# Altium PCB Input_Borad.PcbDoc
Units mil, origin at the board's own origin, x right, y up, seen from the top; angles counter-clockwise.
Board outline 885.83 x 794.57 mil, 2 copper layers (Top Layer, Bottom Layer); 3 components, 2 nets, 12 pads, 0 vias.
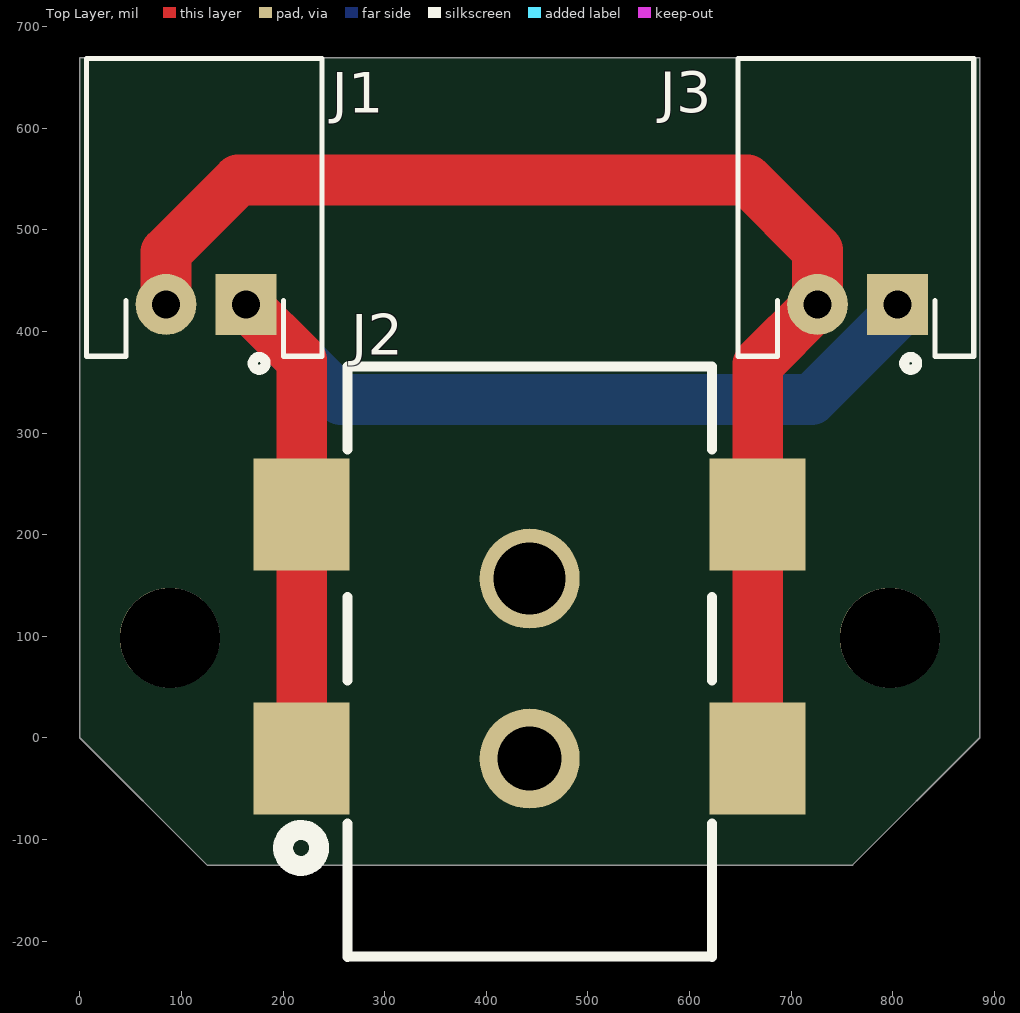
[diagram p0: Top Layer view]
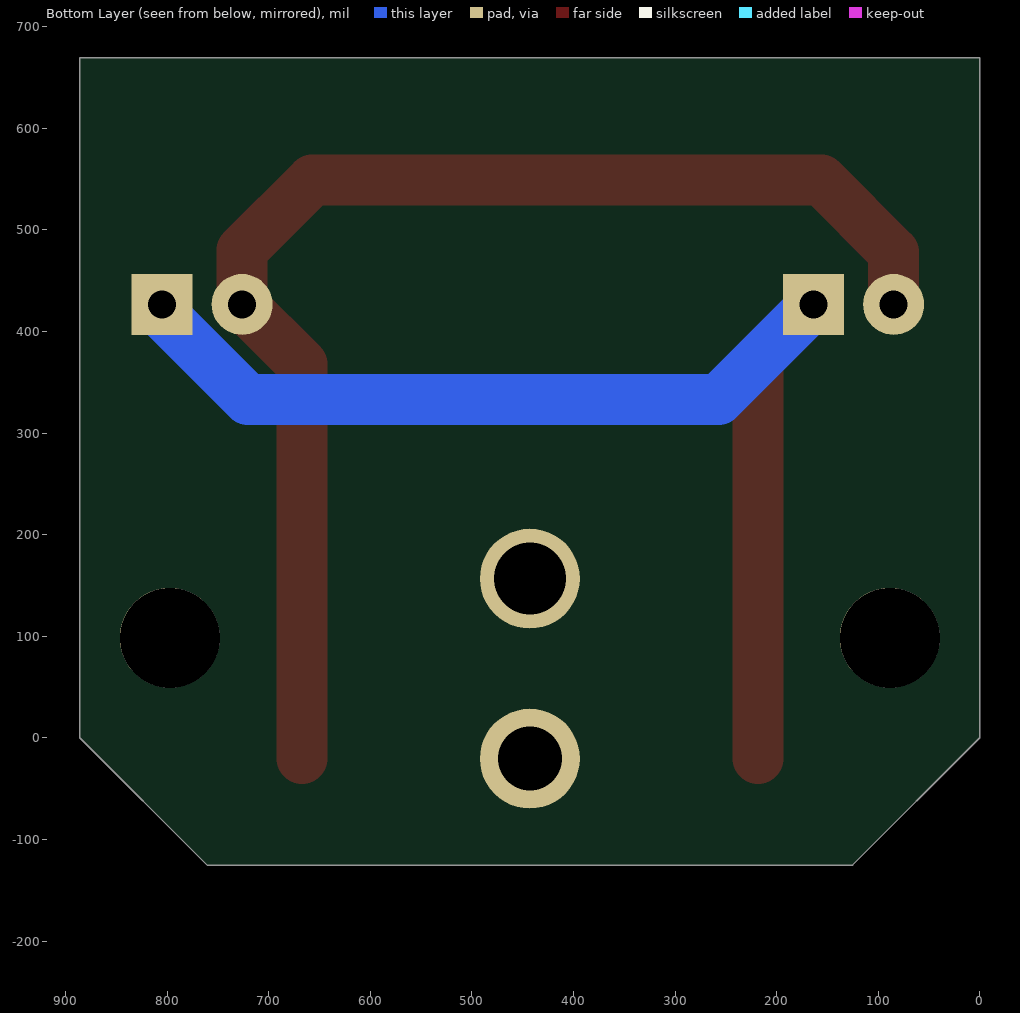
[diagram p1: Bottom Layer view, seen from below]
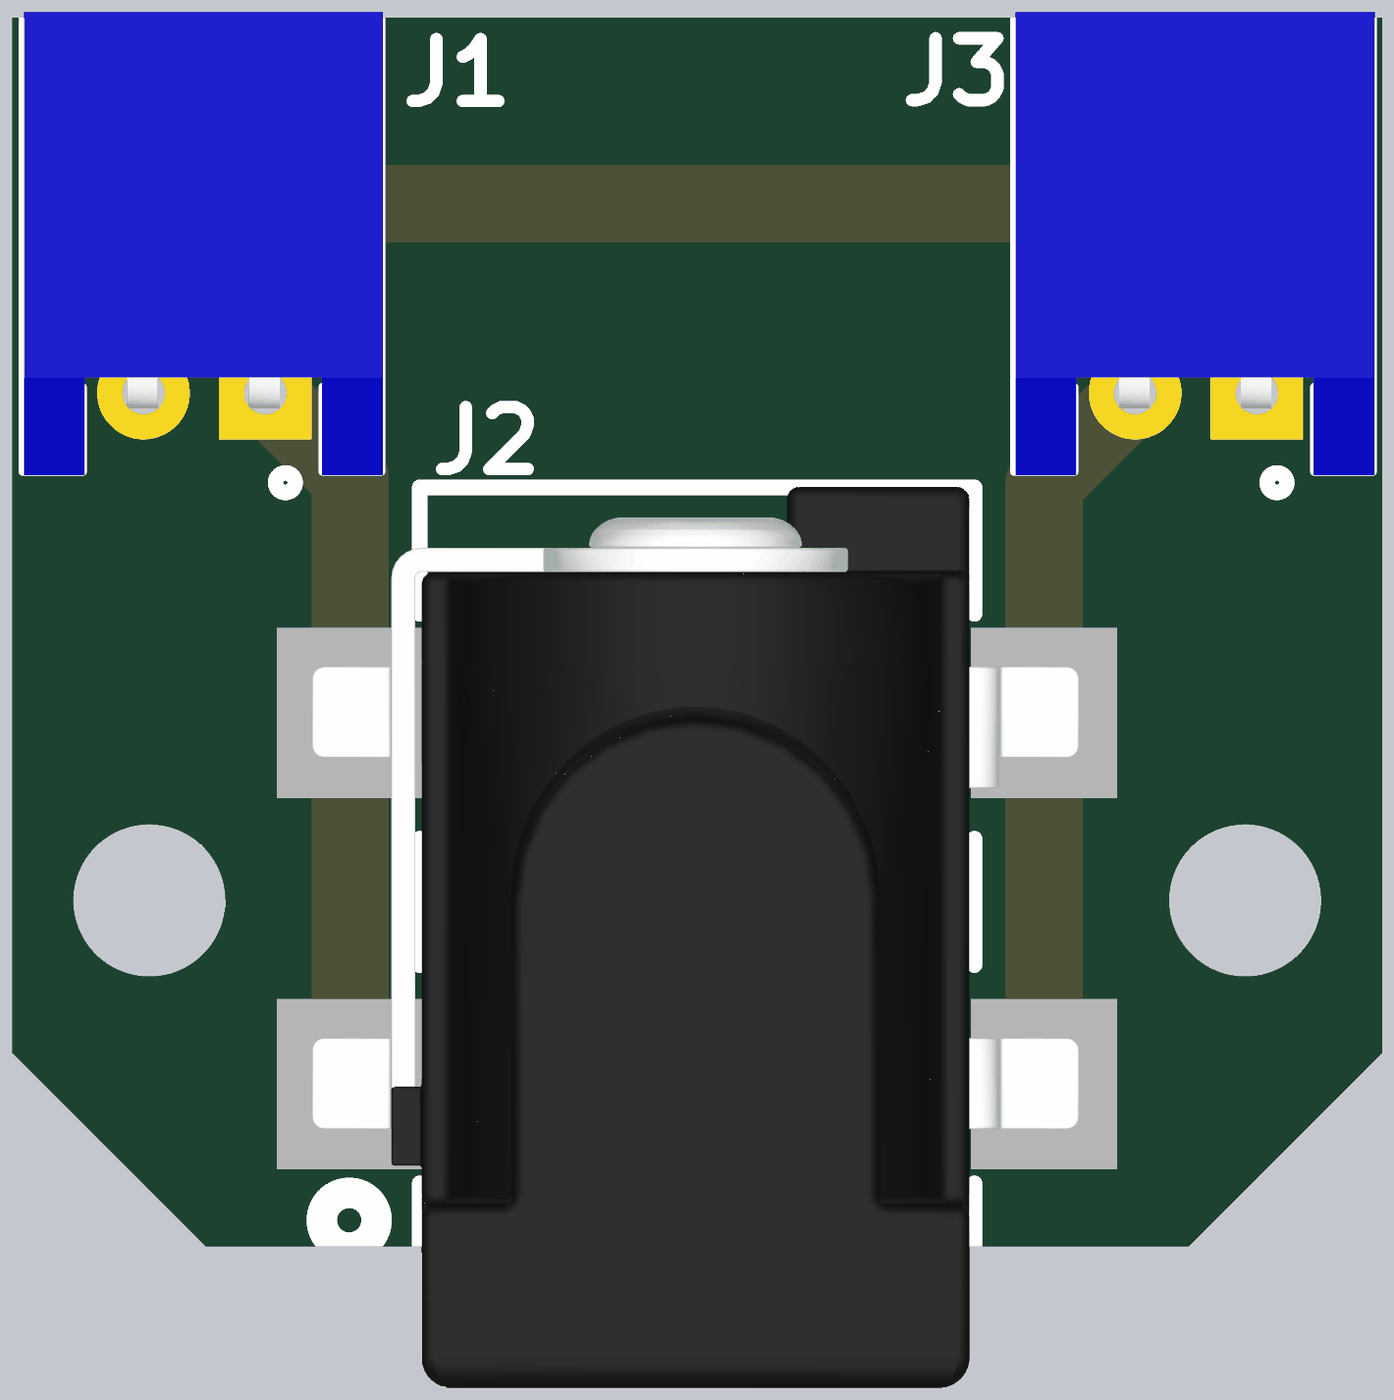
[diagram p2: 3D render of the assembled board from above, using the file's embedded part models]

## Layer stack, top to bottom
Top Solder: solder mask 0.4, Solder Resist, Dk 3.5
Top Layer: signal copper 1.4
Dielectric 1: dielectric 12.6, FR-4, Dk 4.8
Bottom Layer: signal copper 1.4
Bottom Solder: solder mask 0.4, Solder Resist, Dk 3.5

## Board outline
885.83,669.29 0,669.29 0,0 125.27,-125.27 760.55,-125.27 885.83,0

## Design rules (kind name [scope] priority, off if disabled: settings)
Clearance [All] p1: gap=7 ignorepadtopadclearanceinfootprint=FALSE except(0: Arc-Hole Track-Hole SMDPad-Hole THPad-Hole Via-Hole Fill-Hole Poly-Hole Region-Hole Text-Hole)
ComponentClearance [All] p1: gap=0 collisioncheckmode=3 verticalgap=0 showdistances=FALSE
HoleSize [All] p1: absolutevalues=TRUE maxlimit=1000 minlimit=1 maxpercent=80.000 minpercent=20.000
HoleToHoleClearance [All] p1: gap=0 allowstackedmicrovias=TRUE
MinimumSolderMaskSliver [All] p1: minsoldermaskwidth=0
PolygonConnect [All] p1: connectstyle=Relief reliefconductorwidth=10 reliefentries=4 polygonreliefangle="90 Angle" airgapwidth=10
RoutingVias [All] p1: holewidth=11.81 width=31.5 viastyle="Through Hole" minholewidth=7.87 minwidth=17.72 maxholewidth=11.81 maxwidth=31.5
SilkToSilkClearance [All] p1: silktosilkclearance=0
SilkToSolderMaskClearance [IsPad] p1: minsilkscreentomaskgap=0 clearancetoexposedcopper=TRUE
SolderMaskExpansion SolderMaskExpansion_1 [IsVia] p1: expansion=4 soldermaskfromhole=TRUE
SolderMaskExpansion [Not IsVia] p2: expansion=4
Width [All] p1: maxlimit=100 minlimit=10 preferedwidth=10 minimp=50.000000 maximp=50.000000 favimp=50.000000
24 further rules are at their usual default settings.

## Components (designator, comment, footprint, x,y, rotation, side; value= is the part's Value field where it differs from the comment)
J1 "S2B-PH-K-S(LF)(SN)" S2B-PH-K-S(LF)(SN) 163.57,426.55 r180 top locked
J2 "DC-005-5A-2.5-SMT" DC-005-5A-2.5-SMT 442.83,-20.45 r90 top locked value=Custom
J3 "S2B-PH-K-S(LF)(SN)" S2B-PH-K-S(LF)(SN) 804.83,426.55 r180 top locked

## Footprints (in the part's own frame and the unit in brackets; to place one, negate y for a bottom-side part, rotate by r counter-clockwise, add the part's x,y. Pads: shape width x height; smd on the part's side, far side on the other; paste and mask are expansions set on the pad)
DC-005-5A-2.5-SMT [mm]
  rect 2.8x2.4 smd: 1(0,5.7) 1(6.1,5.7) 2(0,-5.7) 3(6.1,-5.7)
  round 2.5 hole 1.6 unplated: MH1(0,0)
  round 2.5 hole 1.8 unplated: MH2(4.5,0)
  silkscreen extent -4.95,-4.56 9.8,6.16, body extent -4.99,-6.27 9.81,6.33, height 11.17
S2B-PH-K-S(LF)(SN) [mil] "PH Header Male Pin 0.079\"(2.00mm) 2 Through Hole,P=2mm Wire To Board / Wire To Wire Connector RoHS"
  rect 60x60 hole 27.56: 1(0,0)
  round 60 hole 27.56: 2(78.74,0)
  silkscreen extent -75,-242 157,64, body extent -76,-246 156,53, height 189

## Part data
J1 J3: "Conn Shrouded Header (4 Sides) HDR 2 POS 2mm Solder RA Thru-Hole Box", Color=Natural,White, Contact Resistance=20mR, Current Rating=2A, Flammability Rating="UL94 V-0", Housing Color=White, Insulation Resistance=1GR, Manufacturer=JST, Max Operating Temperature=85°C, Max Voltage Rating (AC)=100V, Min Operating Temperature=-25°C, Supplier Part Number 1=7754757, Category="Headers and Wire Housings", ComponentLink1Description=https://datasheet.ciiva.com/11747/0900766b8082f558-11747128.pdf?src-supplier=RSComponents, ComponentLink1URL=https://datasheet.ciiva.com/11747/0900766b8082f558-11747128.pdf?src-supplier=RSComponents, ComponentLink2Description=https://datasheet.ciiva.com/712/eph-712447.pdf?src-supplier=Digi-Key, ComponentLink2URL=https://datasheet.ciiva.com/712/eph-712447.pdf?src-supplier=Digi-Key, ComponentLink3Description=https://datasheet.ciiva.com/8052/80564-8052207.pdf?src-supplier=Element14, ComponentLink3URL=https://datasheet.ciiva.com/8052/80564-8052207.pdf?src-supplier=Element14, ComponentLink4Description=https://datasheet.ciiva.com/16484/s2b-ph-k-slfsn-16484405.pdf?src-supplier=Future+Electronics, ComponentLink4URL=https://datasheet.ciiva.com/16484/s2b-ph-k-slfsn-16484405.pdf?src-supplier=Future+Electronics, ComponentLink5Description=https://datasheet.ciiva.com/26894/getdatasheetpartid-641020-26894599.pdf?src-supplier=Verical, ComponentLink5URL=https://datasheet.ciiva.com/26894/getdatasheetpartid-641020-26894599.pdf?src-supplier=Verical, Connector Type="Male Pin", Contact Material=Tin,Brass,Bronze, Contact Mating Length=0.13inch, Contact Plating=Tin,Copper, Contact Type="Male Pin", Depth=7.6mm, Fastening Type=Detent, Gender=Male, Height=9.4mm, Housing Material=Polyamide, Lead Free="Lead Free", Lead Pitch=2mm, Length=5.9mm, Manufacturer Part Number=S2B-PH-K-S(LF)(SN), Max Current Rating=2A, Max Voltage Rating (DC)=100V, Mount="Through Hole", Number of Contacts=2, Number of Pins=2, Number of Poles=2, Number of Positions=2, Number of Rows=1, Orientation="Right Angle", Packaging=Bulk, Pitch=2mm, Pricing 1="1=0.07140, 500=0.06210, 2000=0.06020, 5000=0.05890, 20000=0.05710 (USD)", REACH SVHC="No SVHC", RoHS=Yes, Series=PH, Stock 1=156269, Supplier 1="Future Electronics", Termination=Solder, Voltage Rating=100V, Voltage Rating (AC)=100V, Width=4.5mm, Working Voltage=100V
J2: "DC Power Receptacle Jack 2.5A 2.5mm 6.5mm SMD Power Connectors RoHS", Manufacturer="XKB Enterprise", Package=Custom, Manufacturer Part No=DC-005-5A-2.5-SMT

## Free pads (board coordinates)
  round 98.43 hole 98.42 unplated: MH1(88.58,98.43) MH2(797.24,98.43)

## Nets (pads, with @x,y where several pads share a name; then routed paths per layer and width w, separated by ;. In a path a pad name is that pad's centre, name@x,y a point inside that pad or via, vN(x,y) a via of type N, cw(c..) or ccw(c..) an arc to the next point about the centre after c; other vN are vias at no path point)
GND: J1.2 J2.2 J2.3 J3.2 | length 1275.4
  Top Layer w50: J1.2 84.83,477.83 156,549 657,549 726.09,479.91 J3.2 667.24,367.7 J2.3 J2.2
VIN: J1.1 J2.1 J3.1 | length 1193.7
  Top Layer w50: J1.1 218.42,371.7 218.42,219.71 J2.1@218.42,-20.45
  Bottom Layer w50: J1.1 257.12,333 720.22,333 804.83,417.61 J3.1
pads on no net: J2.MH1 J2.MH2

## Silkscreen, mask and mechanical layers (free items; w line width, h text height)
Mechanical 2:
  the board outline again, w10